# Altium PCB VHF_AMP.PCBDOC (part 4 of 7)
Units mm, origin at the board's own origin, x right, y up, seen from the top; angles counter-clockwise.
Board outline 222.47 x 100.01 mm, 4 copper layers (Top Layer, Int1 (GND), Int2 (PWR), Bottom Layer), stack 1.508 mm thick; 513 components, 284 nets, 1695 pads, 984 vias.
Unrouted connection lines stored in the file: 110.
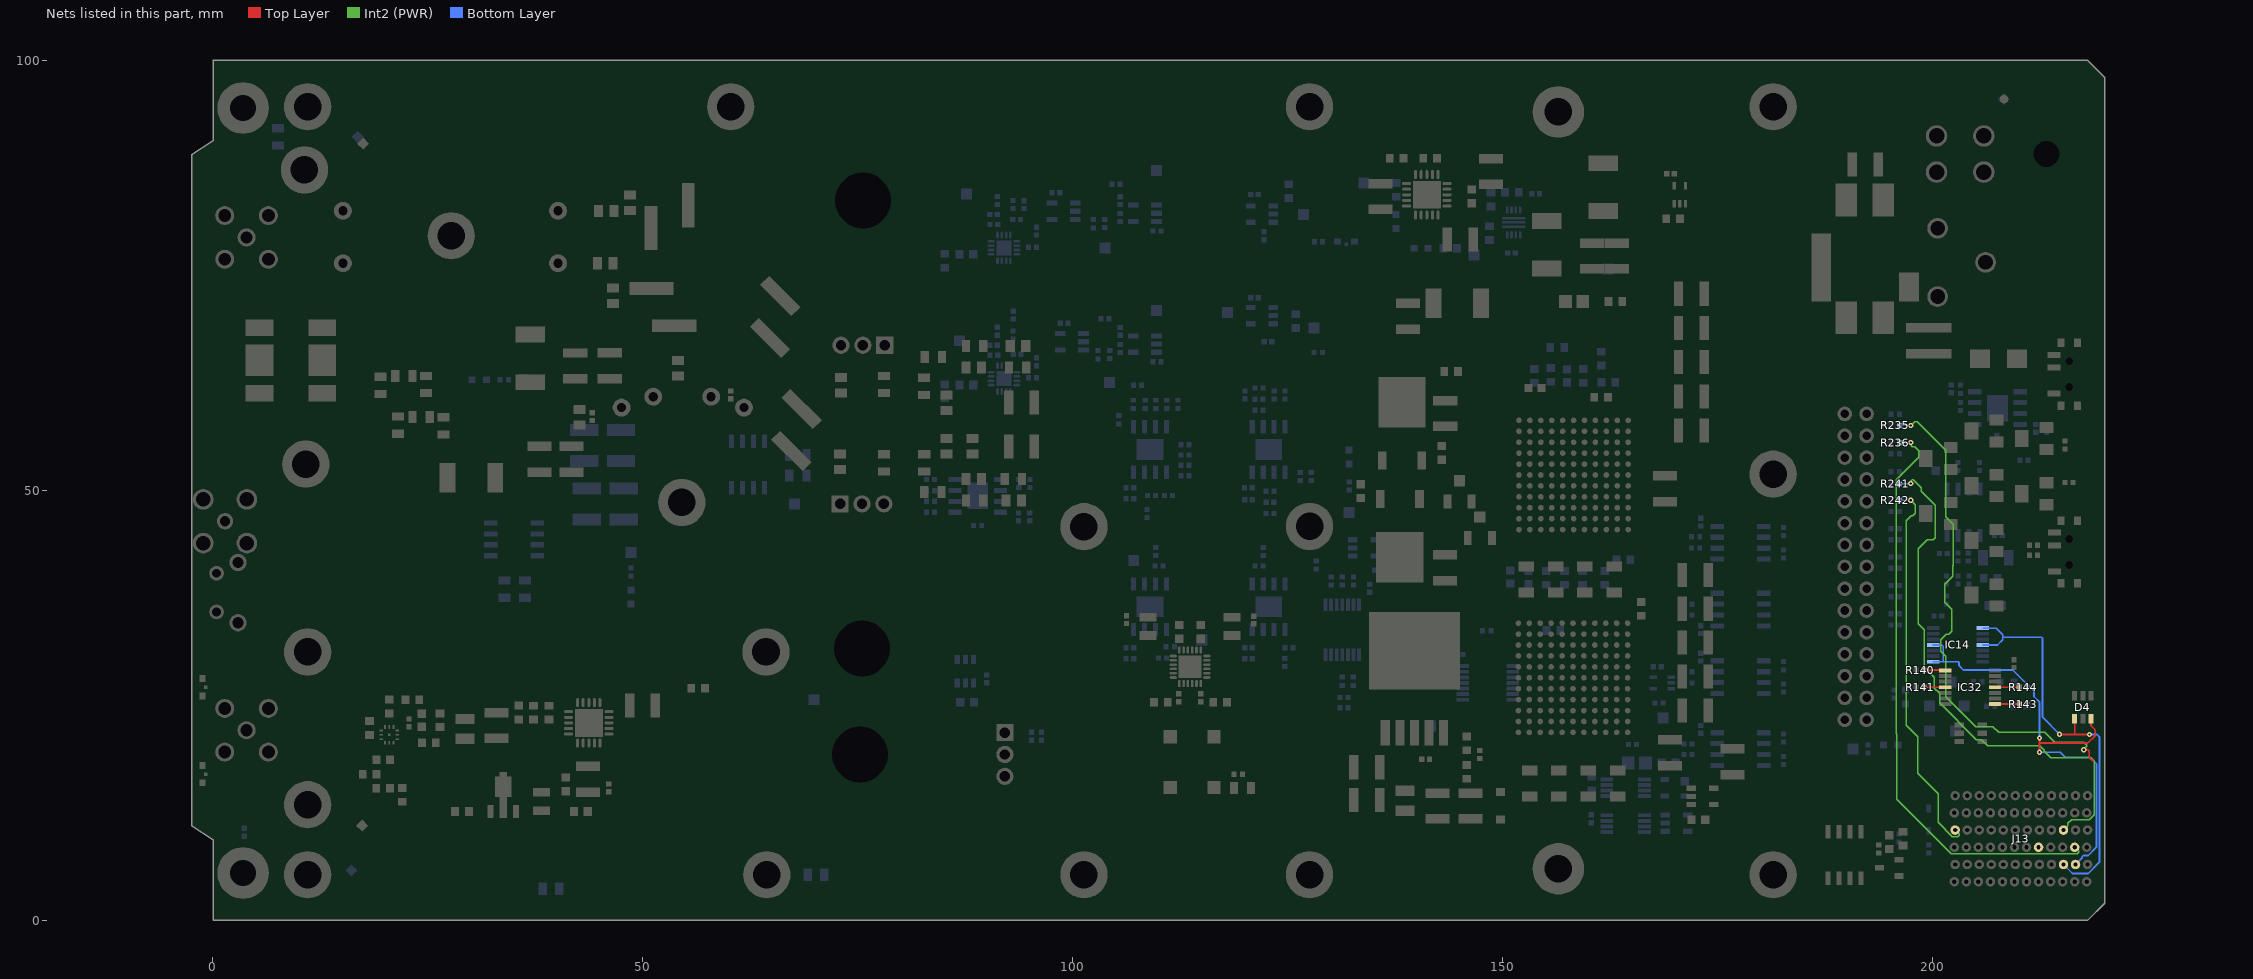
[diagram p4: the nets of this part, all layers, seen from the top]

## Part data (continued)
TR3: library part XFMR_MINI-CIRCUITS_TRS1.5-182+, "50 Ohms 10 to 1800MHz RF Transformer", Manufacturer=MINI-CIRCUITS, Manufacturer Part Number=TRS1.5-182+, Power=1W, Author="CERN DEM BC", Component Type=Standard, ComponentHeight=3.05mm, CreateDate=09.06.2021, HelpURL=\\cern.ch\dfs\Applications\Altium\Datasheets\XFMR_MINI-CIRCUITS_TRS1-5-182+.pdf, LatestRevisionDate=09.06.2021, Mounted=Yes, Part Description="50 Ohms 10 to 1800MHz RF Transformer", Part Number=XFMR_MINI-CIRCUITS_TRS1.5-182+, Pin Count=4, Sense=No, SMD=Yes, Socket=No, Status=None
WASHER1 WASHER2: library part Keystone_7687, "SMA_Shoulder Washer", Author=GK, Component Type=Mechanical, ComponentHeight=1.91mm, CreateDate=28.01.2016, HelpURL=\\cern.ch\dfs\Applications\Altium\Datasheets\AAVID-THERMALLOY_7721-7PPSG.pdf, LatestRevisionDate=28.01.2016, Manufacturer="Custom 3D printed", Manufacturer Part Number="Custom 3D printed", Mounted=Yes, PackageDescription="Polyphenylene Sulfide PPS Shoulder Washer", Part Description="Polyphenylene Sulfide PPS Shoulder Washer", Part Number="Custom 3D printed", Pin Count=0, PressFit=No, Sense=No, SMD=No, Socket=No, Status=None

## Free pads (board coordinates)
  round 6 hole 3.2: 0(156.527,5.993) 0(156.527,93.993)

## Via types
v1: diameter 0.6, hole 0.25, Top Layer to Bottom Layer, tented both sides, 878 vias
v2: diameter 0.6, hole 0.25, Top Layer to Bottom Layer, tented top, 61 vias
v3: diameter 0.5, hole 0.25, Top Layer to Bottom Layer, tented top, 27 vias
v4: diameter 1, hole 0.5, Top Layer to Bottom Layer, tented both sides, 16 vias
v5: diameter 0.5, hole 0.25, Top Layer to Bottom Layer, tented both sides, 2 vias

## Nets (pads, with @x,y where several pads share a name; then routed paths per layer and width w, separated by ;. In a path a pad name is that pad's centre, name@x,y a point inside that pad or via, vN(x,y) a via of type N, cw(c..) or ccw(c..) an arc to the next point about the centre after c; other vN are vias at no path point)
BP_I2C.SCL: D4.3 IC14.8 IC14.11 J13.B2 | length 53
  Top Layer w0.2: v1(212.483,19.538) 212.483,20.62 ; v1(212.483,21.2) 212.483,20.62 ; D4.3@218.463,23.423 218.463,22.614 218.947,22.13 218.947,21.47 218.098,20.62 212.483,20.62
  Bottom Layer w0.2: IC14.8@200.095,30.07 201.283,30.07 ; IC14.11@200.095,32.02 201.107,32.02 201.283,31.844 201.283,30.07 ; v1(212.483,19.538) 214.898,19.538 215.484,18.952 218.35,18.952 219.098,18.204 219.098,12.096 219.091,12.089 219.091,8.486 218.139,7.535 217.552,7.535 217.435,7.418 217.435,7.262 J13.B2@216.666,6.493 ; v1(212.483,21.2) 212.483,25.375 211.835,26.024 211.835,26.629 209.364,29.1 203.62,29.1 203.124,29.596 203.124,29.953 203.007,30.07 201.283,30.07
BP_I2C.SDA: D4.1 IC14.1 IC14.4 J13.C2 | length 48.7
  Top Layer w0.2: v1(214.801,21.63) 214.816,21.615 216.55,21.615 ; D4.1@216.563,23.423 216.563,21.628 216.55,21.615 ; v1(218.3,21.6) 218.285,21.615 216.55,21.615
  Bottom Layer w0.2: IC14.4@205.895,32.02 207.59,32.02 208.186,32.616 208.186,32.915 ; IC14.1@205.895,33.97 207.431,33.97 208.186,33.215 208.186,32.915 ; v1(214.801,21.63) 212.833,23.598 212.833,32.795 212.713,32.915 208.186,32.915 ; J13.C2@215.266,6.493 216.309,5.45 218.154,5.45 219.441,6.736 219.441,11.944 219.448,11.951 219.448,18.349 219.441,18.356 219.441,21.345 219.186,21.6 v1(218.3,21.6)
BP_IO.GA0: IC32.1 R140.1 | length 2.5
  Top Layer w0.2: R140.1@199.07,29.1 201.45,29.1 IC32.1@201.5,29.05
BP_IO.GA1: IC32.4 R141.1 | length 2.4
  Top Layer w0.2: R141.1@199.07,27.1 IC32.4@201.5,27.1
BP_IO.GA2: IC32.8 R143.1 | length 2.8
  Top Layer w0.2: IC32.8@207.3,25.15 R143.1@210.13,25.15
BP_IO.GA3: IC32.11 R144.1 | length 2.8
  Top Layer w0.2: IC32.11@207.3,27.1 R144.1@210.1,27.1
BP_IO.LVDS_N0: J13.E3 R235.1 | length 59.3
  Top Layer w0.152: v1(217.623,19.841) 218.087,19.841 218.278,19.65 218.278,18.92 218.776,18.421
  Int2 (PWR) w0.152: v1(197.5,57.54) 197.949,57.989 198.237,57.989 201.55,54.676 201.55,46.929 202.445,46.033 202.445,41.258 202.394,41.208 202.394,39.998 201.456,39.06 201.456,37.005 202.278,36.183 202.278,33.601 201.945,33.267 201.606,33.267 200.987,32.649 200.987,31.296 201.579,30.705 201.579,25.992 205.066,22.505 207.065,22.505 207.065,22.494 207.709,21.85 213.091,21.85 214.238,20.702 217.63,20.702 217.994,20.338 217.994,20.212 v1(217.623,19.841)
  Bottom Layer w0.152: R235.1@196.17,57.54 v1(197.5,57.54)
BP_IO.LVDS_N1: J13.B3 R236.1 | length 69.2
  Int2 (PWR) w0.152: v1(197.5,55.54) 197.583,55.457 197.583,55.18 197.672,55.091 197.964,55.091 198.43,54.625 198.43,53.831 195.804,51.205 195.804,21.701 195.854,21.651 195.854,14.083 202.222,7.715 216.888,7.715 217.065,7.892 217.065,8.018 216.59,8.493 J13.B3@216.566,8.493
  Bottom Layer w0.152: R236.1@196.17,55.54 v1(197.5,55.54)
BP_IO.LVDS_N2: J13.C4 R241.1 | length 62.8
  Int2 (PWR) w0.152: v1(197.5,50.79) 197.583,50.873 197.583,51.15 197.672,51.239 197.798,51.239 198.734,50.302 198.734,49.903 200.376,48.261 200.376,44.503 200.097,44.224 199.421,44.224 198.38,43.183 198.38,34.458 199.053,33.785 199.053,29.444 199.415,29.082 199.43,29.082 200.24,28.272 200.24,26.999 200.848,26.39 200.848,25.3 205.129,21.02 205.687,21.02 206.435,20.272 212.493,20.272 213.009,19.756 213.009,19.685 213.782,18.913 218.437,18.913 218.842,18.508 218.842,12.272 218.287,11.717 216.221,11.717 215.765,11.261 215.765,10.968 215.29,10.493 J13.C4@215.266,10.493
  Bottom Layer w0.152: R241.1@196.17,50.74 196.22,50.79 v1(197.5,50.79)
BP_IO.LVDS_N3: J13.L4 R242.1 | length 45.2
  Int2 (PWR) w0.152: v1(197.5,48.84) 198.044,48.296 198.044,47.34 197.718,47.014 197.543,47.014 196.974,46.446 196.974,22.656 198.309,21.32 198.309,17.091 200.679,14.721 200.679,11.38 202.344,9.715 202.988,9.715 203.165,9.892 203.165,10.018 202.69,10.493 J13.L4@202.666,10.493
  Bottom Layer w0.152: R242.1@196.17,48.84 v1(197.5,48.84)